# Altium PCB ARGUS.PcbDoc (part 4 of 4)
Units mm, origin at the board's own origin, x right, y up, seen from the top; angles counter-clockwise.
Board outline 134 x 81 mm, 6 copper layers (L1 [SIG], L2 [GND], L3 [PWR], L4 [SIG], L5 [GND], L6 [SIG]), stack 1.538 mm thick; 452 components, 305 nets, 1467 pads, 826 vias.
Unrouted connection lines stored in the file: 646.
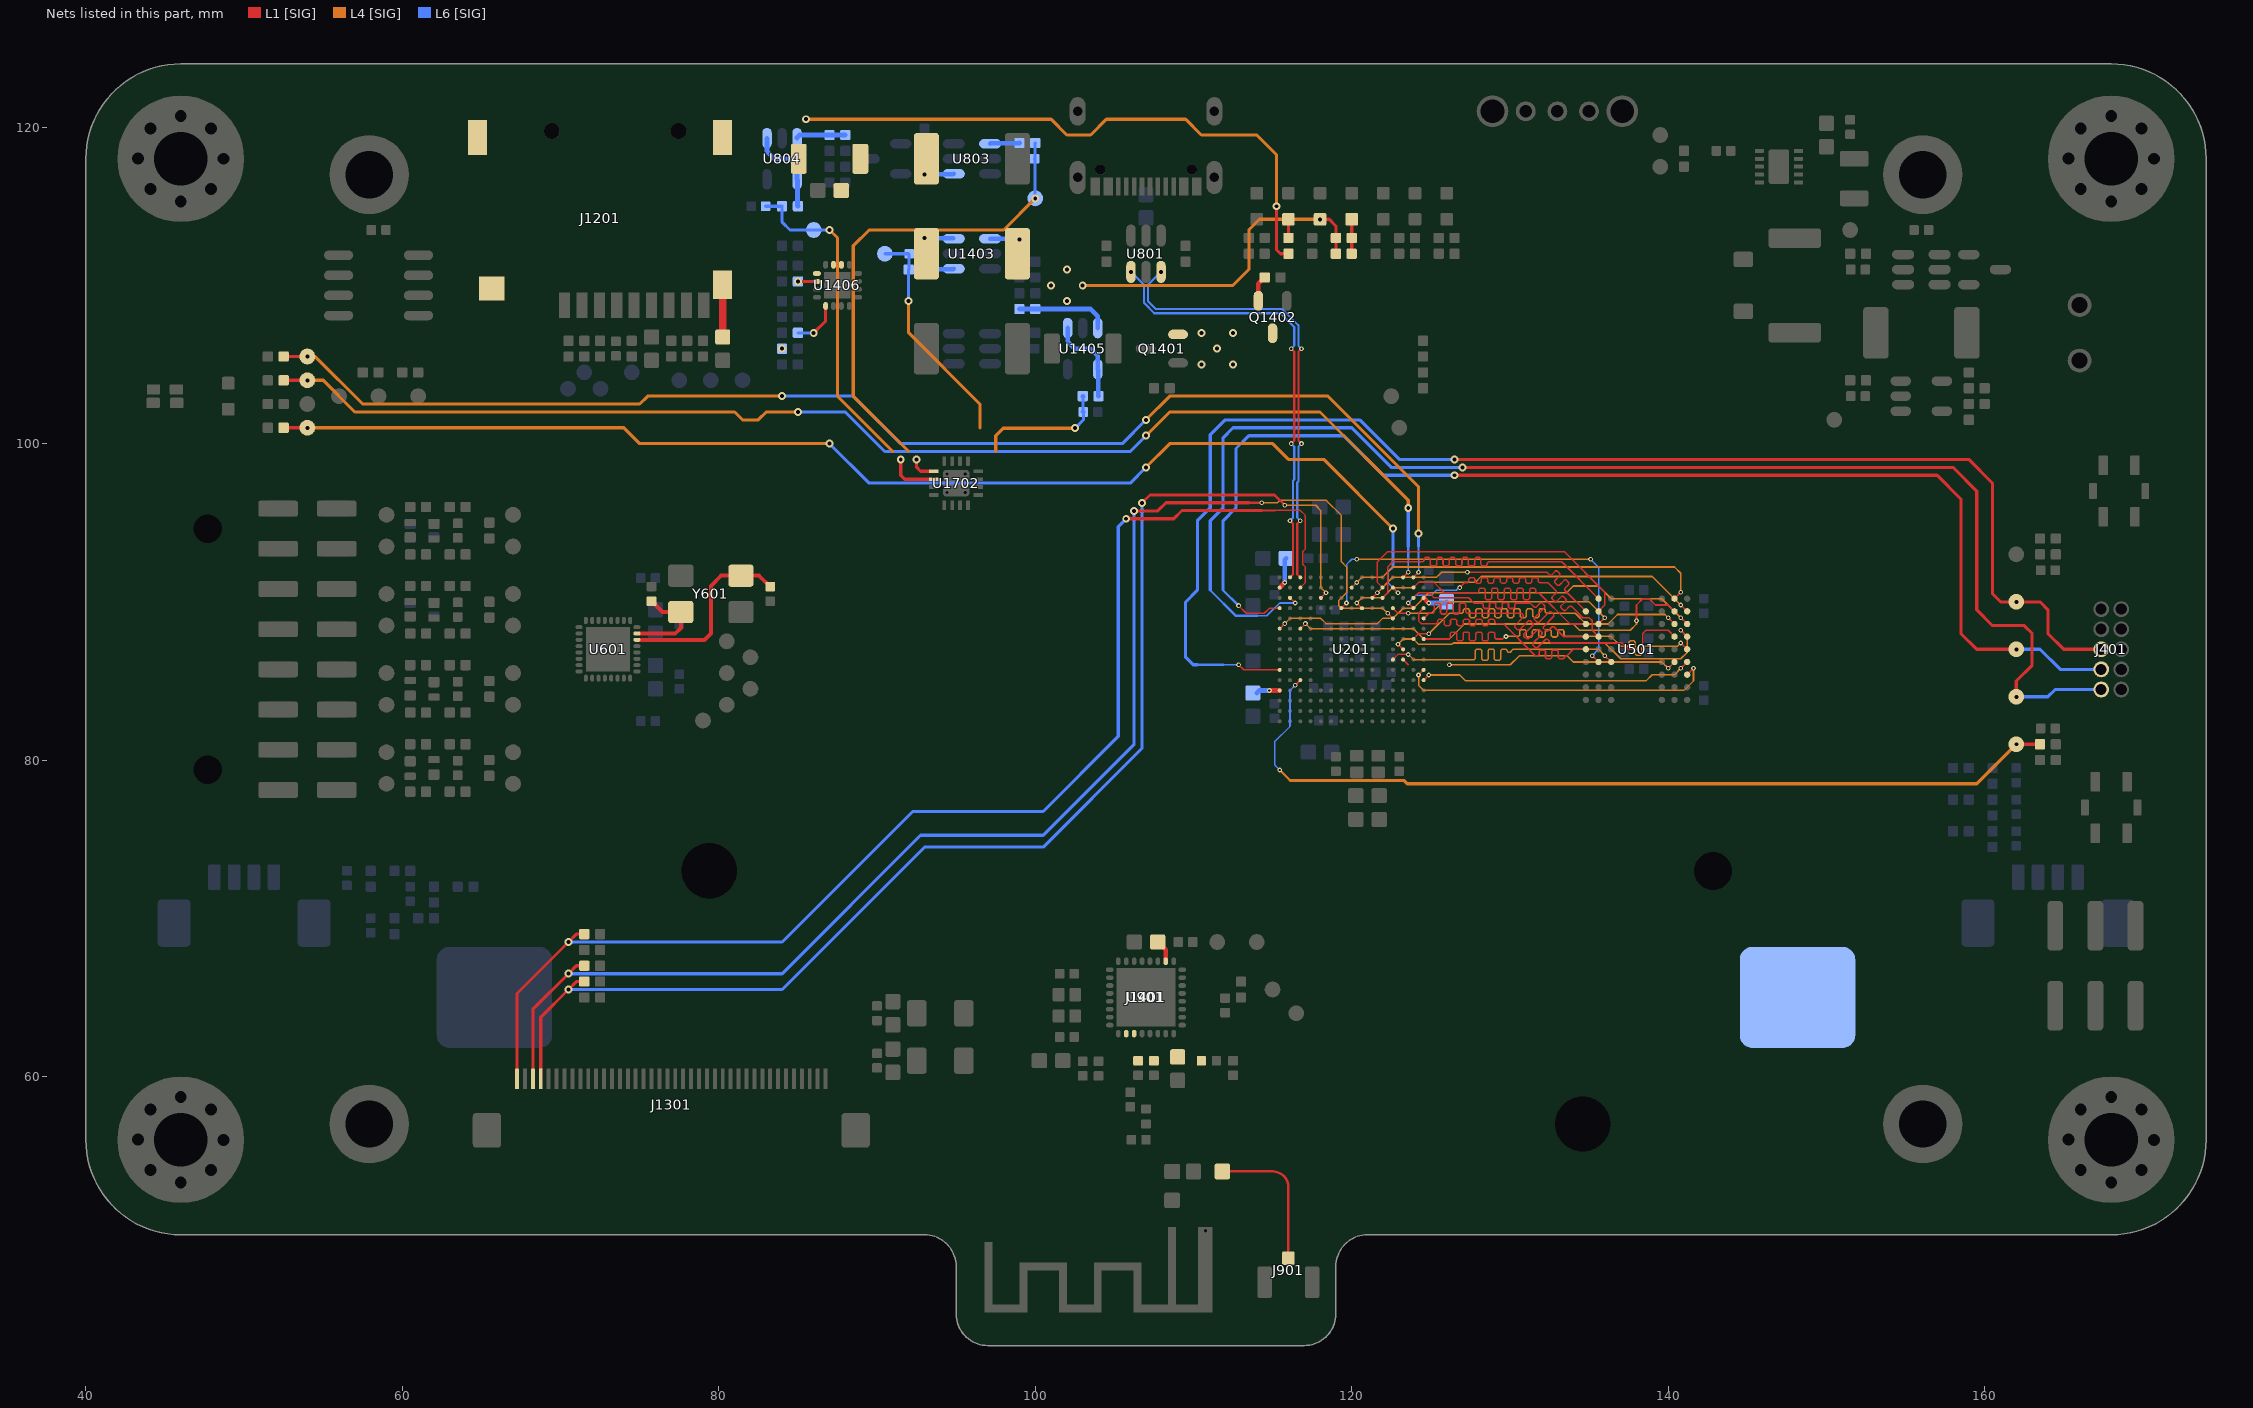
[diagram p8: the nets of this part, all layers, seen from the top]

## Via types
v1: diameter 0.5, hole 0.25, L1 [SIG] to L6 [SIG], tented both sides, 608 vias
v2: diameter 0.3, hole 0.15, L1 [SIG] to L6 [SIG], tented both sides, 209 vias
v3: diameter 0.5, hole 0.2, L1 [SIG] to L6 [SIG], tented both sides, 9 vias

## Nets (pads, with @x,y where several pads share a name; then routed paths per layer and width w, separated by ;. In a path a pad name is that pad's centre, name@x,y a point inside that pad or via, vN(x,y) a via of type N, cw(c..) or ccw(c..) an arc to the next point about the centre after c; other vN are vias at no path point) (continued)
SDRAM_CKE: U201.M7 U501.F3 | length 17.6
  L1 [SIG] w0.1: U201.M7@122.6,86.35 122.925,86.675 v2(123.575,86.675) ; v2(136,86.6) U501.F3@136.4,86.2
  L4 [SIG] w0.1: v2(123.575,86.675) 123.9,86.35 127.689,86.35 127.739,86.35 127.819,86.43 127.819,86.926 127.899,87.006 128.139,87.006 128.219,86.926 128.219,86.384 128.299,86.304 128.539,86.304 128.619,86.384 128.619,86.926 128.699,87.006 128.939,87.006 129.019,86.926 129.019,86.384 129.099,86.304 129.339,86.304 129.419,86.384 129.419,86.926 129.499,87.006 129.739,87.006 129.819,86.926 129.819,86.892 129.899,86.812 130.012,86.812 130.2,87 130.529,87 135.6,87 v2(136,86.6)
SDRAM_CLK: U201.G12 U501.F2 | length 25.5
  L1 [SIG] w0.1: U201.G12@119.35,89.6 v2(119.675,89.925) ; v2(135.2,86.6) U501.F2@135.6,86.2
  L4 [SIG] w0.1: v2(120.325,92.688) v2(135.099,92.688)
  L6 [SIG] w0.1: v2(119.675,89.925) 119.675,92.363 120,92.688 v2(120.325,92.688) ; v2(135.099,92.688) 135.586,92.2 135.6,92.2 135.6,87 v2(135.2,86.6)
SDRAM_CS: U201.R6 U501.G9 | length 20.2
  L1 [SIG] w0.1: v2(124.225,85.375) U201.R6@124.55,85.7 ; U501.G9@141.2,85.4 v2(141.6,85.8)
  L4 [SIG] w0.1: v2(124.225,85.375) 124.225,84.725 124.55,84.4 141,84.4 141.6,85 v2(141.6,85.8)
SDRAM_DQ0: U201.H14 U501.A8 | length 23.3
  L1 [SIG] w0.1: U201.H14@120,90.9 v2(120.325,91.225) ; U501.A8@140.4,90.2 v2(140.8,90.6)
  L4 [SIG] w0.1: v2(120.325,91.225) 120.65,91.55 121.95,91.55 122.6,92.2 140.4,92.2 140.8,91.8 v2(140.8,90.6)
SDRAM_DQ1: U201.J12 U501.B9 | length 22.9
  L1 [SIG] w0.1: v2(120.325,89.925) U201.J12@120.65,89.6 ; v2(140.8,89.8) U501.B9@141.2,89.4
  L4 [SIG] w0.1: v2(120.325,89.925) 120.65,90.25 121.95,90.25 122.6,90.9 123.9,90.9 124.225,91.225 127.8,91.225 128.175,91.6 139,91.6 v2(140.8,89.8)
SDRAM_DQ2: U201.C10 U501.B8 | length 26.6
  L1 [SIG] w0.1: U201.C10@116.75,88.3 v2(117.075,88.625) ; v2(138,88.8) 138,89.8 138.4,90.2 138.8,90.2 139.2,89.8 140,89.8 U501.B8@140.4,89.4
  L4 [SIG] w0.1: v2(117.075,88.625) 117.4,88.3 123.9,88.3 124.55,87.65 126.175,87.65 127.125,88.6 134,88.6 134.4,88.2 137.6,88.2 138,88.6 v2(138,88.8)
SDRAM_DQ3: U201.A10 U501.C9 | length 28.1
  L1 [SIG] w0.1: U201.A10@115.45,88.3 v2(115.775,88.625) ; v2(140.8,89) U501.C9@141.2,88.6
  L4 [SIG] w0.1: v2(115.775,88.625) 116.1,88.95 118.05,88.95 118.375,88.625 121.625,88.625 121.95,88.95 122.305,88.95 122.6,88.95 123.25,89.6 123.9,89.6 124.875,90.575 133.575,90.575 134,91 135.6,91 136.4,90.2 139.6,90.2 v2(140.8,89)
SDRAM_DQ4: U201.P9 U501.C8 | length 23.8
  L1 [SIG] w0.1: U201.P9@123.9,87.65 124.225,87.975 v2(124.875,87.975) ; v2(140,89) U501.C8@140.4,88.6
  L4 [SIG] w0.1: v2(124.875,87.975) 126.175,89.275 126.914,89.275 126.964,89.275 127.044,89.355 127.044,89.475 127.124,89.555 127.364,89.555 127.444,89.475 127.444,89.084 127.524,89.004 127.764,89.004 127.844,89.084 127.844,89.475 127.924,89.555 128.164,89.555 128.244,89.475 128.244,89.084 128.324,89.004 128.564,89.004 128.644,89.084 128.644,89.475 128.724,89.555 128.964,89.555 129.044,89.475 129.044,89.084 129.124,89.004 129.364,89.004 129.444,89.084 129.444,89.475 129.524,89.555 129.764,89.555 129.844,89.475 129.844,89.084 129.924,89.004 130.164,89.004 130.244,89.084 130.244,89.475 130.324,89.555 130.564,89.555 130.644,89.475 130.644,89.084 130.724,89.004 130.964,89.004 131.044,89.084 131.044,89.475 131.124,89.555 131.364,89.555 131.444,89.475 131.444,89.084 131.524,89.004 131.764,89.004 131.844,89.084 131.844,89.475 131.924,89.555 132.164,89.555 132.244,89.475 132.244,89.355 132.324,89.275 132.709,89.275 134.125,89.275 134.8,88.6 136.2,88.6 136.8,89.2 139.8,89.2 v2(140,89)
SDRAM_DQ5: U201.N8 U501.D9 | length 21.7
  L1 [SIG] w0.1: v2(122.925,87.325) U201.N8@123.25,87 ; v2(140.8,88.2) U501.D9@141.2,87.8
  L4 [SIG] w0.1: v2(122.925,87.325) 123.25,87.65 123.9,87.65 124.225,87.325 126.337,87.325 126.412,87.4 136,87.4 137,86.4 140.8,86.4 141.2,86.8 141.2,87.8 v2(140.8,88.2)
SDRAM_DQ6: U201.R11 U501.D8 | length 26.6
  L1 [SIG] w0.1: U201.R11@124.55,88.95 124.875,89.275 125.084,89.275 125.134,89.275 125.214,89.355 125.214,89.837 125.294,89.917 125.534,89.917 125.614,89.837 125.614,89.311 125.694,89.231 125.934,89.231 126.014,89.311 126.014,89.837 126.094,89.917 126.334,89.917 126.414,89.837 126.414,89.311 126.494,89.231 126.734,89.231 126.814,89.311 126.814,89.837 126.894,89.917 127.134,89.917 127.214,89.837 127.214,89.355 127.294,89.275 127.636,89.275 130.443,89.275 130.725,89.275 130.766,89.234 130.846,89.154 130.846,89.041 130.315,88.51 130.315,88.397 130.485,88.228 130.598,88.228 131.177,88.807 131.29,88.807 131.46,88.637 131.46,88.524 130.881,87.945 130.881,87.832 131.05,87.662 131.164,87.662 131.743,88.241 131.856,88.241 132.026,88.072 132.026,87.959 131.446,87.379 131.446,87.266 131.616,87.096 131.729,87.096 132.26,87.627 132.373,87.627 132.435,87.565 132.6,87.4 137.1,87.4 137.5,87 138,87 138.4,87.4 138.4,88 138.6,88.2 140,88.2 U501.D8@140.4,87.8
SDRAM_DQ7: U201.R9 U501.E9 | length 25
  L1 [SIG] w0.1: U201.R9@124.55,87.65 126.108,87.65 126.158,87.65 126.238,87.73 126.238,88.01 126.318,88.09 126.558,88.09 126.638,88.01 126.638,87.619 126.718,87.539 126.958,87.539 127.038,87.619 127.038,88.01 127.118,88.09 127.358,88.09 127.438,88.01 127.438,87.619 127.518,87.539 127.758,87.539 127.838,87.619 127.838,88.01 127.918,88.09 128.158,88.09 128.238,88.01 128.238,87.619 128.318,87.539 128.558,87.539 128.638,87.619 128.638,88.01 128.718,88.09 128.958,88.09 129.038,88.01 129.038,87.733 129.118,87.653 129.205,87.653 129.255,87.653 129.374,87.654 129.537,87.654 129.696,87.813 v2(129.75,87.813) ; v2(140.8,87.4) U501.E9@141.2,87
  L4 [SIG] w0.1: v2(129.75,87.813) 130.489,87.813 130.539,87.813 130.619,87.893 130.619,88.153 130.699,88.233 130.939,88.233 131.019,88.153 131.019,87.856 131.099,87.776 131.339,87.776 131.419,87.856 131.419,88.153 131.499,88.233 131.739,88.233 131.819,88.153 131.819,87.856 131.899,87.776 132.139,87.776 132.219,87.856 132.219,88.153 132.299,88.233 132.539,88.233 132.619,88.153 132.619,87.856 132.699,87.776 132.939,87.776 133.019,87.856 133.019,88.153 133.099,88.233 133.339,88.233 133.419,88.153 133.419,87.893 133.499,87.813 133.997,87.813 136.388,87.813 137,87.2 137.397,87.2 137.447,87.2 137.527,87.28 137.527,87.447 137.607,87.527 137.847,87.527 137.927,87.447 137.927,86.71 138.007,86.63 138.247,86.63 138.327,86.71 138.327,87.12 138.407,87.2 138.598,87.2 140.591,87.2 140.791,87.4 v2(140.8,87.4)
SDRAM_DQ8: U201.R12 U501.E1 | length 17.2
  L1 [SIG] w0.1: U201.R12@124.55,89.6 124.225,89.275 124.225,88.788 124.387,88.625 124.843,88.625 125.366,88.625 125.446,88.705 125.446,88.823 125.526,88.903 125.766,88.903 125.846,88.823 125.846,88.581 125.926,88.501 126.166,88.501 126.246,88.581 126.246,88.823 126.326,88.903 126.566,88.903 126.646,88.823 126.646,88.581 126.726,88.501 126.966,88.501 127.046,88.581 127.046,88.823 127.126,88.903 127.366,88.903 127.446,88.823 127.446,88.581 127.526,88.501 127.766,88.501 127.846,88.581 127.846,88.823 127.926,88.903 128.166,88.903 128.246,88.823 128.246,88.581 128.326,88.501 128.566,88.501 128.646,88.581 128.646,88.823 128.726,88.903 128.966,88.903 129.046,88.823 129.046,88.705 129.126,88.625 129.575,88.625 129.576,88.624 131.6,86.6 131.719,86.6 131.769,86.6 131.849,86.68 131.849,86.87 131.929,86.95 132.169,86.95 132.249,86.87 132.249,86.478 132.329,86.398 132.569,86.398 132.649,86.478 132.649,86.87 132.729,86.95 132.969,86.95 133.049,86.87 133.049,86.478 133.129,86.398 133.369,86.398 133.449,86.478 133.449,86.52 133.529,86.6 133.6,86.6 133.999,86.999 ; 134,87 U501.E1@134.8,87
SDRAM_DQ9: U201.P12 U501.D2 | length 19.5
  L1 [SIG] w0.1: v2(123.575,89.925) U201.P12@123.9,89.6 ; v2(126.825,90.9) 127.125,91.2 127.26,91.2 127.31,91.2 127.39,91.28 127.39,91.437 127.47,91.517 127.71,91.517 127.79,91.437 127.79,91.268 127.87,91.188 128.11,91.188 128.19,91.268 128.19,91.437 128.27,91.517 128.51,91.517 128.59,91.437 128.59,91.268 128.67,91.188 128.91,91.188 128.99,91.268 128.99,91.437 129.07,91.517 129.31,91.517 129.39,91.437 129.39,91.268 129.47,91.188 129.71,91.188 129.79,91.268 129.79,91.437 129.87,91.517 130.11,91.517 130.19,91.437 130.19,91.268 130.27,91.188 130.51,91.188 130.59,91.268 130.59,91.437 130.67,91.517 130.91,91.517 130.99,91.437 130.99,91.268 131.07,91.188 131.31,91.188 131.39,91.268 131.39,91.437 131.47,91.517 131.71,91.517 131.79,91.437 131.79,91.28 131.87,91.2 132.261,91.2 132.4,91.2 132.603,90.997 132.922,90.678 132.922,90.565 132.659,90.302 132.659,90.189 132.828,90.019 132.941,90.019 133.262,90.34 133.375,90.34 133.545,90.17 133.545,90.057 133.224,89.737 133.224,89.623 133.394,89.454 133.507,89.454 133.77,89.717 133.883,89.717 134.012,89.588 134.6,89 135,89 135.2,88.8 135.2,88.2 U501.D2@135.6,87.8
  L6 [SIG] w0.1: v2(123.575,89.925) 124.063,90.413 125.037,90.413 125.362,90.738 126.608,90.738 126.771,90.9 v2(126.825,90.9)
SDRAM_DQ10: U201.P13 U501.D1 | length 17.7
  L1 [SIG] w0.1: U201.P13@123.9,90.25 124.225,90.575 124.875,90.575 125.2,90.25 127.393,90.25 127.718,89.925 127.78,89.925 128.23,89.925 128.31,89.845 128.31,89.66 128.39,89.58 128.63,89.58 128.71,89.66 128.71,89.875 128.79,89.955 129.03,89.955 129.11,89.875 129.11,89.66 129.19,89.58 129.43,89.58 129.51,89.66 129.51,89.875 129.59,89.955 129.83,89.955 129.91,89.875 129.91,89.66 129.99,89.58 130.23,89.58 130.31,89.66 130.31,89.845 130.39,89.925 131.104,89.925 131.275,89.925 131.5,89.7 131.536,89.664 131.649,89.664 131.914,89.93 132.028,89.93 132.197,89.76 132.197,89.647 131.549,88.999 131.549,88.886 131.719,88.716 131.832,88.716 132.48,89.364 132.593,89.364 132.763,89.195 132.763,89.082 132.115,88.433 132.115,88.32 132.284,88.15 132.397,88.15 132.667,88.42 132.78,88.42 132.932,88.268 133.4,87.8 U501.D1@134.8,87.8
SDRAM_DQ11: U201.M12 U501.C2 | length 14.8
  L1 [SIG] w0.1: U201.M12@122.6,89.6 122.925,89.275 v2(123.575,89.275) ; U501.C2@135.6,88.6 v2(136,89)
  L4 [SIG] w0.1: v2(123.575,89.275) 125.037,89.275 125.762,90 135,90 v2(136,89)
SDRAM_DQ12: U201.P14 U501.C1 | length 17.4
  L1 [SIG] w0.1: U201.P14@123.9,90.9 124.225,91.225 125.2,91.225 125.85,90.575 127.91,90.575 127.96,90.575 128.04,90.655 128.04,90.775 128.12,90.855 128.36,90.855 128.44,90.775 128.44,90.223 128.52,90.143 128.76,90.143 128.84,90.223 128.84,90.775 128.92,90.855 129.16,90.855 129.24,90.775 129.24,90.223 129.32,90.143 129.56,90.143 129.64,90.223 129.64,90.775 129.72,90.855 129.96,90.855 130.04,90.775 130.04,90.223 130.12,90.143 130.36,90.143 130.44,90.223 130.44,90.775 130.52,90.855 130.76,90.855 130.84,90.775 130.84,90.223 130.92,90.143 131.16,90.143 131.24,90.223 131.24,90.775 131.32,90.855 131.56,90.855 131.64,90.775 131.64,90.655 131.72,90.575 131.822,90.575 131.825,90.575 133.8,88.6 U501.C1@134.8,88.6
SDRAM_DQ13: U201.L14 U501.B2 | length 18.8
  L1 [SIG] w0.1: U201.L14@121.95,90.9 121.625,91.225 121.625,92.525 122.275,93.175 133.425,93.175 136,90.6 136,89.8 U501.B2@135.6,89.4
SDRAM_DQ14: U201.K13 U501.B1 | length 17.1
  L1 [SIG] w0.1: U201.K13@121.3,90.25 v2(121.625,90.575) ; v2(127.312,91.875) 132.325,91.875 132.472,91.728 132.507,91.693 132.62,91.693 132.876,91.949 132.989,91.949 133.159,91.779 133.159,91.666 132.831,91.338 132.831,91.225 133.001,91.055 133.114,91.055 133.442,91.383 133.555,91.383 133.725,91.213 133.725,91.1 133.469,90.844 133.469,90.731 133.496,90.704 133.532,90.668 U501.B1@134.8,89.4
  L4 [SIG] w0.1: v2(121.625,90.575) 122.6,91.55 125.363,91.55 125.687,91.875 v2(127.312,91.875)
SDRAM_DQ15: U201.L13 U501.A2 | length 20.7
  L1 [SIG] w0.1: U201.L13@121.95,90.25 122.275,90.575 122.275,92.2 122.6,92.525 124.439,92.525 124.489,92.525 124.569,92.605 124.569,92.727 124.649,92.807 124.889,92.807 124.969,92.727 124.969,92.366 125.049,92.286 125.289,92.286 125.369,92.366 125.369,92.727 125.449,92.807 125.689,92.807 125.769,92.727 125.769,92.366 125.849,92.286 126.089,92.286 126.169,92.366 126.169,92.727 126.249,92.807 126.489,92.807 126.569,92.727 126.569,92.366 126.649,92.286 126.889,92.286 126.969,92.366 126.969,92.727 127.049,92.807 127.289,92.807 127.369,92.727 127.369,92.366 127.449,92.286 127.689,92.286 127.769,92.366 127.769,92.727 127.849,92.807 128.089,92.807 128.169,92.727 128.169,92.366 128.249,92.286 128.489,92.286 128.569,92.366 128.569,92.445 128.649,92.525 129.023,92.525 133.275,92.525 U501.A2@135.6,90.2
SDRAM_RAS: U201.N7 U501.F8 | length 15.4
  L1 [SIG] w0.1: U201.N7@123.25,86.35 123.575,86.025 ; v2(140,85.8) U501.F8@140.4,86.2
  L4 [SIG] w0.1: v2(126.175,86.025) 130.025,86.025 130.6,86.6 133.6,86.6 134,86.2 139.6,86.2 v2(140,85.8)
SDRAM_WE: U201.R5 U501.F9 | length 17.4
  L1 [SIG] w0.1: U201.R5@124.55,85.05 v2(124.875,85.375) ; v2(140.8,85.8) U501.F9@141.2,86.2
  L4 [SIG] w0.1: v2(124.875,85.375) 126.825,85.375 127.2,85 138.6,85 139,85.4 140.4,85.4 v2(140.8,85.8)
SH: C1203.1 J1201.10 | length 3.3
  L1 [SIG] w0.5: C1203.1@80.25,106.737 J1201.10@80.25,110.05
Softstart: C1502.1 U1501.6
STAT_B: R407.1 TP407.1 U201.M14 | length 79.7
  L1 [SIG] w0.1: U201.M14@122.6,90.9 v2(122.925,90.575)
  L1 [SIG] w0.2: R407.1@52.5,101 v1(54,101)
  L4 [SIG] w0.2: v1(54,101) 74,101 75,100 v1(87,100) ; v1(107,98.5) 108.5,100 115,100 116,99 118.238,99 v1(122.6,94.638)
  L6 [SIG] w0.1: 122.275,91.875 122.275,91.225 v2(122.925,90.575)
  L6 [SIG] w0.15: 122.275,91.875 122.6,92.2
  L6 [SIG] w0.2: v1(87,100) 89.5,97.5 106,97.5 v1(107,98.5) ; 122.6,92.2 v1(122.6,94.638)
STAT_G: R406.1 TP406.1 U201.N15 | length 81.7
  L1 [SIG] w0.1: U201.N15@123.25,91.55 v2(123.575,91.875)
  L1 [SIG] w0.2: R406.1@52.5,104 v1(54,104)
  L4 [SIG] w0.2: v1(54,104) 55,104 57,102 81,102 81.5,101.5 82.5,101.5 83,102 v1(85,102) ; v1(107,100.5) 108.5,102 118,102 123.575,96.425 v1(123.575,95.938)
  L6 [SIG] w0.1: v2(123.575,91.875) 123.575,92.687
  L6 [SIG] w0.15: 123.575,92.688 123.575,93.5
  L6 [SIG] w0.2: v1(85,102) 88,102 90.5,99.5 106,99.5 v1(107,100.5) ; 123.575,93.5 v1(123.575,95.938)
STAT_R: R405.1 TP405.1 U201.P15 | length 83.9
  L1 [SIG] w0.1: U201.P15@123.9,91.55 v2(124.225,91.875)
  L1 [SIG] w0.2: R405.1@52.5,105.5 v1(54,105.5)
  L4 [SIG] w0.2: v1(54,105.5) 54.5,105.5 57.5,102.5 75,102.5 75.5,103 v1(84,103) ; v1(107,101.5) 108.5,103 118.5,103 124.225,97.275 v1(124.225,94.313)
  L6 [SIG] w0.1: v2(124.225,91.875) 124.225,92.688
  L6 [SIG] w0.15: 124.225,92.688 124.225,93.5
  L6 [SIG] w0.2: v1(84,103) 88.5,103 91.5,100 105.5,100 v1(107,101.5) ; 124.225,93.5 v1(124.225,94.313)
STM_BOOT0: R404.2 TP302.1 U201.C5 | length 55.9
  L1 [SIG] w0.1: v2(116.425,84.725) U201.C5@116.75,85.05
  L1 [SIG] w0.2: v1(162,81) R404.2@163.5,81
  L4 [SIG] w0.15: v2(115.45,79.375) 116.112,78.713
  L4 [SIG] w0.2: 116.112,78.713 123.293,78.713 123.505,78.5 159.5,78.5 v1(162,81)
  L6 [SIG] w0.1: v2(115.45,79.375) 115.125,79.7 115.125,81.15 116.1,82.125 116.1,84.4 v2(116.425,84.725)
SWCLK: J401.4 TP402.1 U201.A12 | length 79.7
  L1 [SIG] w0.1: v2(112.85,89.763) 113.337,89.275 114.475,89.275 114.8,89.6 U201.A12@115.45,89.6
  L1 [SIG] w0.2: v1(126.5,98) 157,98 158.5,96.5 158.5,88 159.5,87 v1(162,87)
  L6 [SIG] w0.15: 111.875,90.738 v2(112.85,89.763)
  L6 [SIG] w0.2: 111.875,90.738 111.875,95.125 112.687,95.938 112.687,99.687 113.5,100.5 119.5,100.5 122,98 v1(126.5,98) ; v1(162,87) 163.5,87 164.77,85.73 J401.4@167.365,85.73
SWDIO: J401.2 TP401.1 U201.B13 | length 87.9
  L1 [SIG] w0.1: U201.B13@116.1,90.25 v2(116.425,89.925)
  L1 [SIG] w0.2: v1(127,98.5) 158,98.5 159.5,97 159.5,89.5 160.5,88.5 162.5,88.5 163,88 163,86 162,85 v1(162,84)
  L6 [SIG] w0.1: 114.031,89.113 114.637,89.113 115.45,89.925 v2(116.425,89.925)
  L6 [SIG] w0.15: 111.062,90.738 112.687,89.113 114.031,89.113
  L6 [SIG] w0.2: 111.062,90.738 111.062,95.125 111.875,95.938 111.875,100.375 112.5,101 120,101 122.5,98.5 v1(127,98.5) ; v1(162,84) 164,84 164.46,84.46 J401.2@167.365,84.46
SWO: J401.6 TP403.1 U201.A6 | length 88.7
  L1 [SIG] w0.1: v2(112.85,86.025) 113.175,85.7 U201.A6@115.45,85.7
  L1 [SIG] w0.2: v1(126.5,99) 159,99 160.5,97.5 160.5,90.5 161,90 v1(162,90) 163.5,90 164,89.5 164,88 165,87 J401.6@167.365,87
  L6 [SIG] w0.1: 111.875,86.025 v2(112.85,86.025)
  L6 [SIG] w0.15: 110.25,86.025 111.875,86.025
  L6 [SIG] w0.2: 110.25,86.025 109.975,86.025 109.5,86.5 109.5,89.988 110.25,90.738 110.25,95.125 111.062,95.938 111.062,100.562 112,101.5 120.5,101.5 123,99 v1(126.5,99)
SYS_I_SENS: C1402.1 R1402.2 TP1403.1 U1701.2 | length 14.4
  L4 [SIG] w0.2: v1(92,109) 92,107 96.5,102.5 96.5,101
  L6 [SIG] w0.2: TP1403.1@90.5,112 92,112 92.02,111.98 92.02,111.02 R1402.2@92,111 v1(92,109)
SYS_I_SENS_OUT: R1402.1 U1403.1 | length 1.9
  L6 [SIG] w0.3: R1402.1@93,111 93.025,111.025 94.825,111.025 U1403.1@94.85,111.05
SYS_LED_A: D1405.1 R1419.2 R1420.2 | length 2.2
  L1 [SIG] w0.2: R1419.2@120,112 R1420.2@120,113 D1405.1@120,114.175
SYS_OUT: R1418.1 U1403.3 U1406.10 U1406.11 | length 1.8
  L6 [SIG] w0.3: v1@93.025,112.975 U1403.3@94.825,112.975
  other v1: 93,113
SYS_SENS: D1404.1 Q1402.2 R1407.2 R1418.2 R1419.1 R1420.1 R1421.1 R1422.1 U1403.4 | length 26
  L1 [SIG] w0.2: v1(118,114.175) 118.575,114.175 119,113.75 R1420.1@119,113 R1419.1@119,112
  L1 [SIG] w0.3: Q1402.2@114.1,109.025 114.1,110.1 R1421.1@114.5,110.5
  L4 [SIG] w0.2: v1(103,110) 112.5,110 113.5,111 113.5,113.5 114.175,114.175 v1(118,114.175)
  L6 [SIG] w0.3: U1403.4@97.15,112.95 98.896,112.95 98.946,112.9 v1(99,112.9) R1407.2@99,111.5
  other v1: 84,106 102,109 101,110 102,111
SYS_V_DIV: R1408.1 R1409.1 U1405.3 | length 5.9
  L6 [SIG] w0.3: R1408.1@99,108.5 R1409.1@100,108.5 103.5,108.5 103.95,108.05 U1405.3@103.95,107.3
SYS_V_SENS: C1404.1 R1411.2 TP1405.1 U1701.1 | length 8.5
  L4 [SIG] w0.2: 97.5,99.5 97.5,100.5 97.975,100.975 v1(102.525,100.975)
  L6 [SIG] w0.2: v1(102.525,100.975) 103.04,101.49 C1404.1@103.04,102 ; C1404.1@103.02,102.02 R1411.2@103.02,102.98
  L6 [SIG] w0.3: R1411.2@103,103 R1411.2@103.02,102.98 ; C1404.1@103.02,102.02 C1404.1@103.04,102
SYS_V_SENS_OUT: R1411.1 U1405.1 U1405.4 | length 5.7
  L6 [SIG] w0.3: U1405.1@102.05,107.3 102.05,106.45 102.5,106 103.5,106 103.95,105.55 U1405.4@103.95,104.7 103.975,104.675 103.975,103.025 R1411.1@104,103
TMR: R1427.1 U1406.14 | length 1.2
  L1 [SIG] w0.2: v1(85,110.25) U1406.14@86.2,110.25
TOUCH_IRQ: J1301.40 R1305.2 U201.C14 | length 81.8
  L1 [SIG] w0.1: 115.125,95.775 116.75,95.775 117.075,95.45 117.075,93.338 116.912,93.175 116.912,92.363 117.075,92.2 117.075,91.225 U201.C14@116.75,90.9
  L1 [SIG] w0.15: 114.312,95.775 115.125,95.775
  L1 [SIG] w0.2: J1301.40@67.25,59.85 67.25,65.25 v1(70.5,68.5) 71,69 R1305.2@71.5,69 ; v1(105.75,95.25) 108.75,95.25 109.275,95.775 114.312,95.775
  L6 [SIG] w0.2: v1(70.5,68.5) 84,68.5 92.25,76.75 100.5,76.75 105.25,81.5 105.25,94.75 v1(105.75,95.25)
TOUCH_SCL: J1301.38 R1304.2 U201.M11 | length 88.9
  L1 [SIG] w0.1: v2(122.275,89.275) U201.M11@122.6,88.95
  L1 [SIG] w0.15: 113.5,96.263 v2(114.312,96.263)
  L1 [SIG] w0.2: J1301.38@68.25,59.85 68.25,64.25 v1(70.5,66.5) 71,67 R1304.2@71.5,67 ; v1(106.25,95.75) 107.75,95.75 108.263,96.263 113.5,96.263
  L4 [SIG] w0.1: v2(114.312,96.263) 115.314,96.263 115.476,96.425 118.375,96.425 119.35,95.45 119.35,92.525 119.675,92.2 119.675,90.575 119.187,90.088 119.187,89.763 119.35,89.6 121.95,89.6 v2(122.275,89.275)
  L6 [SIG] w0.2: v1(70.5,66.5) 84,66.5 92.75,75.25 100.5,75.25 106.25,81 v1(106.25,95.75)
TOUCH_SDA: J1301.37 R1301.2 U201.E13 | length 83.4
  L1 [SIG] w0.1: U201.E13@118.05,90.25 v2(118.375,90.575)
  L1 [SIG] w0.15: 115.125,96.75 v2(115.775,96.1)
  L1 [SIG] w0.2: J1301.37@68.75,59.85 68.75,63.75 v1(70.5,65.5) 71,66 R1301.2@71.5,66 ; v1(106.75,96.25) 107.25,96.75 115.125,96.75
  L4 [SIG] w0.1: v2(115.775,96.1) 117.725,96.1 118.05,95.775 118.05,90.9 v2(118.375,90.575)
  L6 [SIG] w0.2: v1(70.5,65.5) 84,65.5 93,74.5 100.5,74.5 106.75,80.75 v1(106.75,96.25)
TS: R1425.1 U1406.1 | length 3
  L1 [SIG] w0.2: v1(86,107) 86.75,107.75 U1406.1@86.75,108.7
  L6 [SIG] w0.2: R1425.1@85,107 v1(86,107)
UFL_IN: J901.1 R902.2 | length 9.2
  L1 [SIG] w0.156: R902.2@111.825,54 115,54 cw(c115,53) 116,53 J901.1@116,48.525
USB_D_N: U201.C15 U801.6 | length 29.2
  L1 [SIG] w0.135: U801.6@107.95,110.45 v1(107.95,110.85) ; U201.C15@116.75,91.55 116.556,91.744 116.556,94.534 116.556,94.931 v2(116.75,95.125) ; v2(116.825,100) 116.631,100.194 116.631,105.806 v2(116.825,106)
  L6 [SIG] w0.135: v1(107.95,110.85) 107.131,110.031 107.131,109 107.631,108.5 115.608,108.5 116.631,107.478 116.631,106.194 v2(116.825,106) ; v2(116.75,95.125) 116.556,95.319 116.556,97.547 116.631,97.622 116.631,99.806 v2(116.825,100)
USB_D_P: U201.B15 U801.4 | length 29.2
  L1 [SIG] w0.135: U801.4@106.05,110.45 v1(106.05,110.85) ; U201.B15@116.1,91.55 116.294,91.744 116.294,94.425 116.294,94.931 v2(116.1,95.125) ; v2(116.175,100) 116.369,100.194 116.369,105.806 v2(116.175,106)
  L6 [SIG] w0.135: v1(106.05,110.85) 106.869,110.031 106.869,108.892 107.522,108.238 115.5,108.238 116.369,107.369 116.369,106.194 v2(116.175,106) ; v2(116.1,95.125) 116.294,95.319 116.294,97.656 116.369,97.731 116.369,99.806 v2(116.175,100)
VBATT: J1401.1 Q1401.2 TP1406.1
  other v1: 110.5,105 112.5,105 111.5,106 110.5,107 112.5,107
VBUS: C1405.1 F1401.1 R803.2 TP801.1 U803.4 | length 1.9
  L6 [SIG] w0.3: v1(93,117) 93.025,117.025 94.825,117.025 U803.4@94.85,117.05
VBUS_FUSE: F1401.2 R1412.1 U1406.13 | length 38.4
  L1 [SIG] w0.2: v1(115.25,115) 115.25,112.25 115.5,112 R1412.1@116,112
  L4 [SIG] w0.2: v1(85.5,120.5) 101,120.5 102,119.5 103.5,119.5 104.5,120.5 109.5,120.5 110.5,119.5 114,119.5 115.25,118.25 v1(115.25,115)
VBUS_I_SENS: C803.1 R804.2 TP802.1 U1702.6 | length 33.9
  L1 [SIG] w0.2: v1(91.5,99) 91.5,98 91.75,97.75 U1702.6@93.6,97.75
  L4 [SIG] w0.2: 92,99.5 88.5,103 88.5,112.5 89.5,113.5 98,113.5 v1(100,115.5)
  L6 [SIG] w0.2: v1(100,115.5) 99.98,115.52 99.98,117.98 C803.1@99.96,118 99.98,118.02 99.98,118.98 R804.2@100,119
VBUS_I_SENS_OUT: R804.1 U803.1 | length 1.9
  L6 [SIG] w0.3: U803.1@97.15,118.95 97.175,118.975 98.975,118.975 R804.1@99,119
VBUS_LED_A: D1401.1 R1412.2 | length 1.2
  L1 [SIG] w0.2: R1412.2@116,113 D1401.1@116,114.175
VBUS_V_DIV: R806.1 R807.1 U804.3 | length 3.2
  L6 [SIG] w0.3: U804.3@84.95,119.3 84.95,119.361 85.089,119.5 R807.1@87,119.5 R806.1@88,119.5
VBUS_V_SENS: C804.1 R809.2 TP803.1 U1702.5 | length 22.6
  L1 [SIG] w0.2: v1(92.5,99) 92.5,98.5 92.75,98.25 U1702.5@93.6,98.25
  L4 [SIG] w0.2: v1(87,113.5) 87.5,113 87.5,103 91,99.5
  L6 [SIG] w0.2: C804.1@82.96,115 R809.2@84,115 84,114 84.5,113.5 TP803.1@86,113.5 v1(87,113.5)
VBUS_V_SENS_OUT: R809.1 U804.1 U804.4 | length 5.7
  L6 [SIG] w0.3: U804.1@83.05,119.3 83.05,118.45 83.5,118 84.5,118 84.95,117.55 U804.4@84.95,116.7 84.975,116.675 84.975,115.025 R809.1@85,115
VCAP_1: C325.1 U201.A4 | length 1.5
  L1 [SIG] w0.3: v2(114.8,84.4) U201.A4@115.45,84.4
  L6 [SIG] w0.3: C325.1@114,84.237 114.162,84.4 v2(114.8,84.4)
VCAP_2: C326.1 U201.A14 | length 2
  L1 [SIG] w0.3: U201.A14@115.45,90.9 v2(115.775,91.225)
  L6 [SIG] w0.3: v2(115.775,91.225) 115.775,92.663 C326.1@115.862,92.75
VCAP_3: C327.1 U201.R13 | length 1.6
  L1 [SIG] w0.3: U201.R13@124.55,90.25 v2(124.875,89.925)
  L6 [SIG] w0.3: v2(124.875,89.925) 125.912,89.925 C327.1@126,90.013
VDD3P3: C907.1 C908.1 C909.1 L902.1 U901.2 U901.3
VDDSPI: C910.1 U901.18 | length 1.4
  L1 [SIG] w0.3: C910.1@107.737,68.5 107.75,68.5 108.25,68 U901.18@108.25,67.287
VSYS: C1408.1 C1501.1 C1601.1 C1602.1 C1603.1 C1609.1 L1501.2 Q1402.3 TP1407.1 U1501.9 U1501.10 U1601.10 U1601.12 U1603.1 U1603.3
XTAL1: C608.1 U601.23 Y601.1 | length 6.1
  L1 [SIG] w0.25: U601.23@74.825,88 77.25,88 77.6,88.35 Y601.1@77.6,89.35 76.45,89.35 75.76,90.04 C608.1@75.75,90.04
XTAL2: C607.1 U601.22 Y601.3 | length 12.1
  L1 [SIG] w0.25: U601.22@74.825,87.6 79.1,87.6 79.5,88 79.5,91 80.15,91.65 Y601.3@81.4,91.65 82.55,91.65 83.24,90.96 C607.1@83.25,90.96
pads on no net: J401.7 J401.8 J801. J801.A8 J801.B8 J1201. J1801.M J1802.M SW401.3 SW402.3 SW1401.2 SW1401.4 U201.B1 U201.B2 U201.B3 U201.C4 U201.F1 U201.H13 U201.J13 U201.N1 U201.N2 U201.N5 U201.N12 U201.N13 U201.P3 U201.P6 U201.P7 U201.P10 U201.R2 U201.R3 U501.E2 U501.G1 U601.27 U901.4 U901.5 U901.6 U901.8 U901.14 U901.16 U901.19 U901.20 U901.21 U901.22 U901.23 U901.24 U901.25 U901.26 U1001.8 U1501.8 U1601.11 U1701.6 U1701.12 U1702.12
copper on no net: | length 0

## Polygon pours and split planes (outlines as drawn)
SYS_SENS on L1 [SIG] (solid, pour order 140): 114.5,110 115,109.5 115,108.5 114.5,108 100,108 99,109 97,109 96,110 96,114 97,115 100,115 101,114 101,113 102,112 103,112 104,111 105,110
BATT_FUSE on L1 [SIG] "BATT_FUSE_L01_P128" (solid, pour order 128): 103,107 104,108 107,108 108,107 108,105 107,104 104,104 103,105
VBATT on L1 [SIG] "VBATT_L01_P133" (solid, pour order 133): 108,107 109,108 112.5,108 113,107.5 113,104.5 112.5,104 109,104 108,105
SYS_OUT on L1 [SIG] "SYS_OUT_L01_P120" (solid, pour order 120): 88,115 87,114 87,111 88,111 88,112 89,113 90,113 91,112 91,110 92,109 95,109 96,110 96,114 95,115
BATT_SENS on L1 [SIG] "BATT_SENS_L01_P126" (solid, pour order 126): 96,108 97,109 99,109 100,108 102,108 103,107 103,105 102,104 100,104 99,103 97,103 96,104
BATT_IN on L1 [SIG] "BATT_IN_L01_P125" (solid, pour order 125): 92,109 91,108 90,107 89,107 88,108 88,109 87,109 87,104 88,103 95,103 96,104 96,108 95,109
VBUS on L1 [SIG] "VBUS_L01_P118" (solid, pour order 118): 87.5,115 87,115.5 87,120 88,121 95,121 96,120 96,116 95,115
CON_VBUS on L1 [SIG] "CON_VBUS_L01_P097" (solid, pour order 97): 104.25,115.5 104.25,117 103.5,117 101.5,115 97,115 96,116 96,120 97,121 110,121 110.5,120.5 110.5,118 109.75,117.25 109.75,115.5
VBUS_FUSE on L1 [SIG] "VBUS_FUSE_L01_P121" (solid, pour order 121): 83,113.5 83.5,113 83.5,112.5 85.5,110.5 86.5,110.5 86.5,115.5 87,116 87,120 86,121 84,121 83,120
GND on L1 [SIG] "GND_L01_P113" (solid, pour order 113): 103.25,117 104.25,117 104.25,115.25 104.5,115 104.5,113.5 103.5,112.5 102,112.5 101.5,113 101.5,115 102.5,116 103,116 103,116.75
GND on L1 [SIG] "GND_L01_P114" (solid, pour order 114): 110.75,117 109.75,117 109.75,115.25 109.5,115 109.5,113.5 110.5,112.5 112,112.5 112.5,113 112.5,115 111.5,116 111,116 111,116.75
GND on L1 [SIG] "GND_L01_P090" (solid, pour order 90): 57.5,112 57,112.5 54,112.5 53.5,112 53.5,108 54,107.5 57,107.5 57.5,108
+3V3 on L1 [SIG] "+3V3_L01_P112" (solid, pour order 112): 111,60.5 111,61.75 111.25,62 114.5,62 115,61.5 115,61 114.5,60.5
+3V3_RTC on L1 [SIG] "+3V3_RTC_L01_P111" (solid, pour order 111): 146.25,118.25 144.75,118.25 144.25,117.75 143.75,117.75 143.5,118 143.5,119 143.75,119.25 146,119.25 146.25,119
+3V3_RTC on L1 [SIG] "+3V3_RTC_L01_P110" (solid, pour order 110): 147.75,117.75 147.75,117.25 150.25,117.25 150.75,117.75 150.75,118.75 151,119 152,119 152.25,119.25 152.25,119.75 152,120 151,120 150.5,119.5 149.75,119.5 149.5,119.25 149.5,118.25 149,117.75
GND on L1 [SIG] "GND_L01_P109" (solid, pour order 109): 94,65 95,66 96,66 97,65 97,60 96,59 95,59 94,60
GND on L1 [SIG] "GND_L01_P108" (solid, pour order 108): 85.5,59.25 86,59.25 86,60.5 86.5,61 89.5,61 91.5,61 91.75,61.25 91.75,63.75 91.5,64 88.25,64 85.5,61.25
+3V3 on L1 [SIG] "L1 [SIG]-+3V3" (solid, pour order 107): 89.5,64 91.5,64 91.75,63.75 91.75,63 92,62.75 93.75,62.75 94,63 94,65 93,66 89.5,66 85,61.5 85,59.25 85.5,59.25 85.5,61.25 88.25,64
+5V on L1 [SIG] "L1 [SIG]-+5V" (solid, pour order 105): 86.25,58.5 89.5,58.5 90,59 93,59 94,60 94,62 93.75,62.25 92,62.25 91.75,62 91.75,61.25 91.5,61 89.5,61 86.5,61 86,60.5 86,58.75
GND on L1 [SIG] "GND_L01_P040" (solid, pour order 40): 40,76 40,74 72,74 ccw(c72,77) 75,77 75,87 73,87 73,77 cw(c72,77) 72,76
GND on L1 [SIG] "GND_L01_P067" (solid, pour order 67): 40,98 40,100 72,100 cw(c72,97) 75,97 75,87 73,87 73,97 ccw(c72,97) 72,98
GND on L1 [SIG] "L1 [SIG]-GND" (solid, pour order 101): 109,57 ccw(c110,57) 110,56 118,56 cw(c118,55) 119,55 119,51 ccw(c120,51) 120,50 171.46,50 ccw(c171.46,52.54) 174,52.54 174,87 171,87 171,63 cw(c168,63) 168,60 168,57.54 cw(c166.46,57.54) 166.46,56 164,56 cw(c161,56) 161,53 123,53 cw(c123,54) 122,54 122,58 ccw(c121,58) 121,59 110,59 ccw(c110,58) 109,58
GND on L1 [SIG] "L1 [SIG]-GND 1" (solid, pour order 100): 94,50 ccw(c94,51) 95,51 95,55 cw(c96,55) 96,56 104,56 ccw(c104,57) 105,57 105,58 ccw(c104,58) 104,59 93,59 ccw(c93,58) 92,58 92,54 cw(c91,54) 91,53 53,53 cw(c53,56) 50,56 47.54,56 cw(c47.54,57.54) 46,57.54 46,60 cw(c46,63) 43,63 43,87 40,87 40,52.54 ccw(c42.54,52.54) 42.54,50 80,50
GND on L1 [SIG] "GND_L01_P055" (solid, pour order 55): 174,121.46 ccw(c171.46,121.46) 171.46,124 107,124 107,121 161,121 cw(c161,118) 164,118 166.46,118 cw(c166.46,116.46) 168,116.46 168,114 cw(c168,111) 171,111 171,87 174,87
GND on L1 [SIG] "GND_L01_P079" (solid, pour order 79): 40,121.46 cw(c42.54,121.46) 42.54,124 107,124 107,121 53,121 ccw(c53,118) 50,118 47.54,118 ccw(c47.54,116.46) 46,116.46 46,114 ccw(c46,111) 43,111 43,87 40,87
GND on L1 [SIG] "GND_L01_P010" (solid, pour order 10): 118.6,85.4 118.4,85.6 118.4,88.4 118.6,88.6 121.4,88.6 121.6,88.4 121.6,85.6 121.4,85.4
+3V3 on L1 [SIG] "+3V3_L01_P094" (solid, pour order 94): 146,108.5 145.5,109 144,109 143.5,108.5 143.5,105.5 144,105 145.5,105 146,105.5
GND on L1 [SIG] "GND_L01_P089" (solid, pour order 89): 101,61.5 101.5,62 101.75,62 102,62.25 102,64.25 101.75,64.5 99.5,64.5 99,64 99,58.75 104.5,58.75 104.5,60.25 104.25,60.5 102.5,60.5 102.25,60.25 101.25,60.25 101,60.5
GND on L1 [SIG] "GND_L01_P086" (solid, pour order 86): 108.25,59 108.75,59 109,58.75 109,58 112.25,58 113.25,59 113.25,60.25 113,60.5 106.25,60.5 106,60.25 106,60 106.25,59.75 107.5,59.75
GND on L1 [SIG] "GND_L01_P002" (solid, pour order 2): 43,97 42.5,97 42.5,98.5 44,98.5 44,98 ccw(c44,97)
VDD3P3 on L1 [SIG] "VDD3P3_L01_P084" (solid, pour order 84): 106,62 105.5,62.5 105.5,63 105.75,63.25 106.25,63.25 106.5,63 106.5,62.5 107,62 110.75,62 111,61.75 111,60.75 110.75,60.5 106.5,60.5 106,61
SH on L1 [SIG] "SH_L01_P096" (solid, pour order 96): 69,109 70,110 79,110 79.5,109.5 80,109 81,109 81.5,109.5 81.5,120.5 81,121 64.5,121 64,120.5 64,109.5 64.5,109
+3V3_RTC on L1 [SIG] "+3V3_RTC_L01_P093" (solid, pour order 93): 149.5,110.5 150.5,111.5 150.5,115 150,115.5 144,115.5 143.5,115 143.5,111.5 144.5,110.5
CAP_I_SENS- on L1 [SIG] "CAP_I_SENS-_L01_P092" (solid, pour order 92): 163,105 165,107 168,107 169,108 169,110 168,111 164,111 162,109 159,109 158.5,108.5 158.5,105.5 159,105
CAP_I_SENS+ on L1 [SIG] "CAP_I_SENS+_L01_P091" (solid, pour order 91): 146,105.5 146.5,105 153,105 153.5,105.5 153.5,108.5 153,109 146.5,109 146,108.5
+3V3 on L1 [SIG] "+3V3_L01_P088" (solid, pour order 88): 101,61.5 101.5,62 103,62 103.5,62.5 103.5,63.5 104,64 105,64 105.25,63.75 105.25,63.25 104.5,62.5 104.5,60.75 104.25,60.5 102.5,60.5 102.25,60.25 101.25,60.25 101,60.5
no net on L1 [SIG] "NONET_L01_P085" (solid, pour order 85): 105.5,60 106,60.5
GND on L6 [SIG] "GND_L06_P138" (solid, pour order 138): 58,67 60,69 69,69 70,68 70,60 68,58 62,58 58,62
VBATT on L6 [SIG] (solid, pour order 137): 144,99 141,102 109,102 108,103 108,107 109,108 115,108 116,107 122,107 149,107 152,104 152,72 154,70 154,62 152,60 144,60 142,62 142,70 144,72
+1V65_REF on L6 [SIG] "+1V65_REF_L06_P132" (solid, pour order 132): 98,112 cw(c97.5,112) 97.5,111.5 96.5,111.5 96,111 96,113 96.5,112.5 97.5,112.5 cw(c97.5,112)
GND on L6 [SIG] "L6 [SIG]-GND" (solid, pour order 124): 83.75,110.75 83.5,110.5 83.5,108.75 83.75,108.5 85.5,108.5 85.5,107.5 85,107.5 84.5,107 84.5,104.5 84,104 83,104 82,105 82,106 81.5,106.5 81,107 81,113 81.5,113.5 84,113.5 84.5,113 84.5,112 84.75,111.75 85.5,111.75 85.75,111.5 85.75,111 85.5,110.75
GND on L6 [SIG] "GND_L06_P080" (solid, pour order 80): 40,121.46 cw(c42.54,121.46) 42.54,124 107,124 107,121 53,121 ccw(c53,118) 50,118 47.54,118 ccw(c47.54,116.46) 46,116.46 46,114 ccw(c46,111) 43,111 43,87 40,87
NetC801_1 on L6 [SIG] "NETC801_1_L06_P115" (solid, pour order 115): 108,115 109,116 112,116 112.5,116.5 112.5,120.5 112,121 102,121 101.5,120.5 101.5,116.5 102,116 105,116 106,115
GND on L6 [SIG] "GND_L06_P116" (solid, pour order 116): 101.5,115.5 102,116 105,116 106,115 108,115 109,116 112,116 112.5,115.5 112.5,113 112,112.5 102,112.5 101.5,113
GND on L6 [SIG] "GND_L06_P035" (solid, pour order 35): 174,121.46 ccw(c171.46,121.46) 171.46,124 107,124 107,121 161,121 cw(c161,118) 164,118 166.46,118 cw(c166.46,116.46) 168,116.46 168,114 cw(c168,111) 171,111 171,87 174,87
GND on L6 [SIG] "GND_L06_P007" (solid, pour order 7): 40,98 40,100 72,100 cw(c72,97) 75,97 75,87 73,87 73,97 ccw(c72,97) 72,98
GND on L6 [SIG] "GND_L06_P008" (solid, pour order 8): 40,76 40,74 72,74 ccw(c72,77) 75,77 75,87 73,87 73,77 cw(c72,77) 72,76
GND on L6 [SIG] "GND_L06_P016" (solid, pour order 16): 78.5,88.5 78,89 74.5,89 74,88.5 74,85.5 74.5,85 78,85 78.5,85.5
+3V3 on L6 [SIG] "+3V3_L06_P064" (solid, pour order 64): 75.75,90.5 75,90 75,89 75.75,88.5 79,88.5 79.5,89 79.5,90 79,90.5
GND on L6 [SIG] "GND_L06_P050" (solid, pour order 50): 40,52.54 ccw(c42.54,52.54) 42.54,50 107,50 107,53 53,53 cw(c53,56) 50,56 47.54,56 cw(c47.54,57.54) 46,57.54 46,60 cw(c46,63) 43,63 43,87 40,87
GND on L6 [SIG] "GND_L06_P001" (solid, pour order 1): 118.25,86 118,86.25 118,87.75 118.25,88 121.75,88 122,87.75 122,86.25 121.75,86
GND on L6 [SIG] "GND_L06_P037" (solid, pour order 37): 174,52.54 cw(c171.46,52.54) 171.46,50 107,50 107,53 161,53 ccw(c161,56) 164,56 166.46,56 ccw(c166.46,57.54) 168,57.54 168,60 ccw(c168,63) 171,63 171,87 174,87
no net on L6 [SIG] "NONET_L06_P011" (solid, pour order 11): 74,85.5 73.5,85
+3V3A on L6 [SIG] "+3V3A_L06_P013" (solid, pour order 13): 75.75,85.5 75,85 75,84 75.75,83.5 79,83.5 79.5,84 79.5,85 79,85.5
no net on Top Solder "GND_L01_P043" (solid): 40,99 ccw(c41,99) 41,98 43,98 43,111 cw(c46,111) 46,114 46,116.46 cw(c47.54,116.46) 47.54,118 50,118 cw(c53,118) 53,121 63.5,121 ccw(c63.5,122) 64.5,122 64.5,124 42.54,124 ccw(c42.54,121.46) 40,121.46
no net on Top Solder "GND_L01_P065" (solid): 74,83.5 cw(c74,82.5) 75,82.5 75,77 cw(c72,77) 72,74 41.5,74 41.5,76 72,76 ccw(c72,77) 73,77 73,82.5 cw(c74,82.5)
no net on Top Solder (solid): 41,76 ccw(c41,75) 40,75 40,52.54 ccw(c42.54,52.54) 42.54,50 94,50 ccw(c94,51) 95,51 95,55 cw(c96,55) 96,56 104,56 ccw(c104,57) 105,57 105,58 ccw(c104,58) 104,59 93,59 ccw(c93,58) 92,58 92,54 cw(c91,54) 91,53 53,53 cw(c53,56) 50,56 47.54,56 cw(c47.54,57.54) 46,57.54 46,60 cw(c46,63) 43,63 43,76
no net on Top Solder (solid): 126.75,121 ccw(c126.75,122) 127.75,122 127.75,124 127,124 112,124 112,122 ccw(c113,122) 113,121 121,121
no net on Top Solder (solid): 139.25,121 cw(c139.25,122) 138.25,122 138.25,124 139,124 171.46,124 cw(c171.46,121.46) 174,121.46 174,87 171,87 171,111 ccw(c168,111) 168,114 168,116.46 ccw(c166.46,116.46) 166.46,118 164,118 ccw(c161,118) 161,121
no net on Top Solder "GND_L01_P065" (solid, pour order 65): 74,90.5 ccw(c74,91.5) 75,91.5 75,97 ccw(c72,97) 72,100 41.5,100 41.5,98 72,98 cw(c72,97) 73,97 73,91.5 ccw(c74,91.5)
no net on Top Solder (solid): 120,50 171.46,50 ccw(c171.46,52.54) 174,52.54 174,87 171,87 171,63 cw(c168,63) 168,60 168,57.54 cw(c166.46,57.54) 166.46,56 164,56 cw(c161,56) 161,53 123,53 cw(c123,54) 122,54 122,58 ccw(c121,58) 121,59 110,59 ccw(c110,58) 109,58 109,57 ccw(c110,57) 110,56 118,56 cw(c118,55) 119,55 119,51 ccw(c120,51)
no net on Top Solder "GND_L01_P043" (solid): 81.5,121 cw(c81.5,122) 80.5,122 80.5,124 102,124 102,122 cw(c101,122) 101,121
GND on L5 [GND] "GND_L05_P038" (solid, pour order 38): 40,125 40,50 174,50 174,125
no net on Bottom Solder "GND_L01_P033" (solid, pour order 33): 133,122.5 137.75,122.5 cw(c137.75,121.75) 138.5,121.75 138.5,121 139.5,121 161,121 cw(c161,118) 164,118 166.46,118 cw(c166.46,116.46) 168,116.46 168,114 cw(c168,111) 171,111 171,87 174,87 174,121.46 ccw(c171.46,121.46) 171.46,124 139.5,124 138.5,124 133,124
no net on Bottom Solder "GND_L01_P033" (solid, pour order 33): 127.5,121 127.5,121.75 cw(c128.25,121.75) 128.25,122.5 133,122.5 133,124 127.5,124 126.5,124 107,124 107,121
no net on Bottom Solder "GND_L01_P029" (solid, pour order 29): 174,52.54 cw(c171.46,52.54) 171.46,50 107,50 107,53 161,53 ccw(c161,56) 164,56 166.46,56 ccw(c166.46,57.54) 168,57.54 168,60 ccw(c168,63) 171,63 171,87 174,87
no net on Bottom Solder "GND_L06_P036" (solid, pour order 36): 40,52.54 ccw(c42.54,52.54) 42.54,50 107,50 107,53 53,53 cw(c53,56) 50,56 47.54,56 cw(c47.54,57.54) 46,57.54 46,60 cw(c46,63) 43,63 43,87 40,87
no net on Bottom Solder "GND_L01_P033" (solid): 40,121.46 cw(c42.54,121.46) 42.54,124 107,124 107,121 53,121 ccw(c53,118) 50,118 47.54,118 ccw(c47.54,116.46) 46,116.46 46,114 ccw(c46,111) 43,111 43,87 40,87
GND on L3 [PWR] "GND_L03_P061" (solid, pour order 61): 174,121.46 ccw(c171.46,121.46) 171.46,124 107,124 107,121 161,121 cw(c161,118) 164,118 166.46,118 cw(c166.46,116.46) 168,116.46 168,114 cw(c168,111) 171,111 171,87 174,87
GND on L3 [PWR] "GND_L03_P052" (solid, pour order 52): 174,52.54 cw(c171.46,52.54) 171.46,50 107,50 107,53 161,53 ccw(c161,56) 164,56 166.46,56 ccw(c166.46,57.54) 168,57.54 168,60 ccw(c168,63) 171,63 171,87 174,87
GND on L3 [PWR] "GND_L03_P053" (solid, pour order 53): 40,52.54 ccw(c42.54,52.54) 42.54,50 107,50 107,53 53,53 cw(c53,56) 50,56 47.54,56 cw(c47.54,57.54) 46,57.54 46,60 cw(c46,63) 43,63 43,87 40,87
GND on L3 [PWR] "GND_L03_P054" (solid, pour order 54): 40,121.46 cw(c42.54,121.46) 42.54,124 107,124 107,121 53,121 ccw(c53,118) 50,118 47.54,118 ccw(c47.54,116.46) 46,116.46 46,114 ccw(c46,111) 43,111 43,87 40,87
CON_VBUS on L4 [SIG] "L4 [SIG]-CON_VBUS" (solid, pour order 131): 108.5,118 109,118.5 109,119.5 108.5,120 105.5,120 105,119.5 105,118.5 105.5,118
GND on L4 [SIG] "GND_L04_P059" (solid, pour order 59): 174,52.54 cw(c171.46,52.54) 171.46,50 107,50 107,53 161,53 ccw(c161,56) 164,56 166.46,56 ccw(c166.46,57.54) 168,57.54 168,60 ccw(c168,63) 171,63 171,87 174,87
GND on L4 [SIG] "GND_L04_P057" (solid, pour order 57): 40,121.46 cw(c42.54,121.46) 42.54,124 107,124 107,121 53,121 ccw(c53,118) 50,118 47.54,118 ccw(c47.54,116.46) 46,116.46 46,114 ccw(c46,111) 43,111 43,87 40,87
GND on L4 [SIG] "GND_L04_P060" (solid, pour order 60): 40,52.54 ccw(c42.54,52.54) 42.54,50 107,50 107,53 53,53 cw(c53,56) 50,56 47.54,56 cw(c47.54,57.54) 46,57.54 46,60 cw(c46,63) 43,63 43,87 40,87
GND on L4 [SIG] "GND_L04_P058" (solid, pour order 58): 174,121.46 ccw(c171.46,121.46) 171.46,124 107,124 107,121 161,121 cw(c161,118) 164,118 166.46,118 cw(c166.46,116.46) 168,116.46 168,114 cw(c168,111) 171,111 171,87 174,87
GND on L2 [GND] "GND_L02_P039" (solid, pour order 39): 40,125 40,50 174,50 174,125
GND on L2 [GND] "GND_L02_P081" (solid, pour order 81): 112,50 cw(c112,49) 113,49 113,43 117,43 ccw(c117,45) 119,45 119,48 cw(c121,48) 121,50 121,51 112,51

## Silkscreen, mask and mechanical layers (free items; w line width, h text height)
Top Overlay:
  drawing of 136 lines, arcs and shapes, not listed
  text "RTC" at 145,118.9 h2
  text "ON" at 128.5,117 h1.5
  text "OFF" at 133,117 h1.5
  text "VBATT" at 115,116.4 h1.5 r90
  text "VBUS" at 117,116.4 h1.5 r90
  text "CHG" at 119,116.4 h1.5 r90
  text "VSYS" at 121,116.4 h1.5 r90
  text "+5V" at 123,116.4 h1.5 r90
  text "+3V3" at 125,116.4 h1.5 r90
  text "+3V3A" at 127,116.4 h1.5 r90
  text "SD CARD" at 64.5,109 h2 r90
  text "EEPROM" at 55,105.436 h2
  text "BEAT" at 50,104.4 h2 r90
  text "STAT" at 46,103.9 h2 r90
  text "CH1" at 68,97 h1.52 r270
  text "RST" at 162.25,96 h2
  text "MCU" at 121,92.207 h2
  text "CH3" at 68,92 h1.52 r270
  text "SDRAM" at 135.983,91.114 h2
  text "CH5" at 68,87 h1.52 r270
  text "SWD" at 165.25,84.75 h2 r90
  text "CH7" at 68,82 h1.52 r270
  text "ADC" at 73,77 h2 r90
  text "BT0" at 161.75,76 h2
  text "UART" at 163.993,71.5 h2
  text "RST" at 163.8,67 h1 r90
  text "TX" at 166.328,67 h1 r90
  text "3V3" at 168.88,67 h1 r90
  text "BT0" at 163.8,62.5 h1 r90
  text "RX" at 166.34,62.5 h1 r90
  text "GND" at 168.88,62.5 h1 r90
  text "DISP" at 60.579,53.5 h2
Bottom Overlay:
  lines w0.127: 57.5,82 70,82 ; 57.5,87 70,87 ; 57.5,92 70,92 ; 127.5,120.75 127.5,120.25 ccw(c128.25,120.25) 128.25,119.5 128.5,119.5 131.5,119.5 134.5,119.5 137.5,119.5 137.75,119.5 ccw(c137.75,120.25) 138.5,120.25 138.5,120.75
  lines w0.254: 57.5,77 70,77 70,97 57.5,97
  text "CH0" at 68,92 h1.52 r270
  text "CH2" at 68,87 h1.52 r270
  text "CH4" at 68,82 h1.52 r270
  text "CH6" at 68,77 h1.52 r270
Mechanical 1:
  the board outline again, w0.127

## Text inside footprints (layer, text, board x,y; h text height)
C1004: Top Overlay "+" at 165.619,111.169 h1.52; Top Overlay "-" at 165.6,102.92 h1.52 r270; Bottom Overlay "-" at 166.4,102.88 h1.52 r90; Bottom Overlay "+" at 166.381,111 h1.52 r180